# Altium PCB NB3000XN.PcbDoc (part 39 of 71)
Units mil, origin at the board's own origin, x right, y up, seen from the top; angles counter-clockwise.
Board outline 9527.56 x 6929.77 mil, 6 copper layers (Top Layer, GND+SHIELD, MidLayer1, MidLayer2, P2 - 3V3+5V0, Bottom Layer), stack 62.375 mil thick; 832 components, 1027 nets, 4655 pads, 4981 vias.
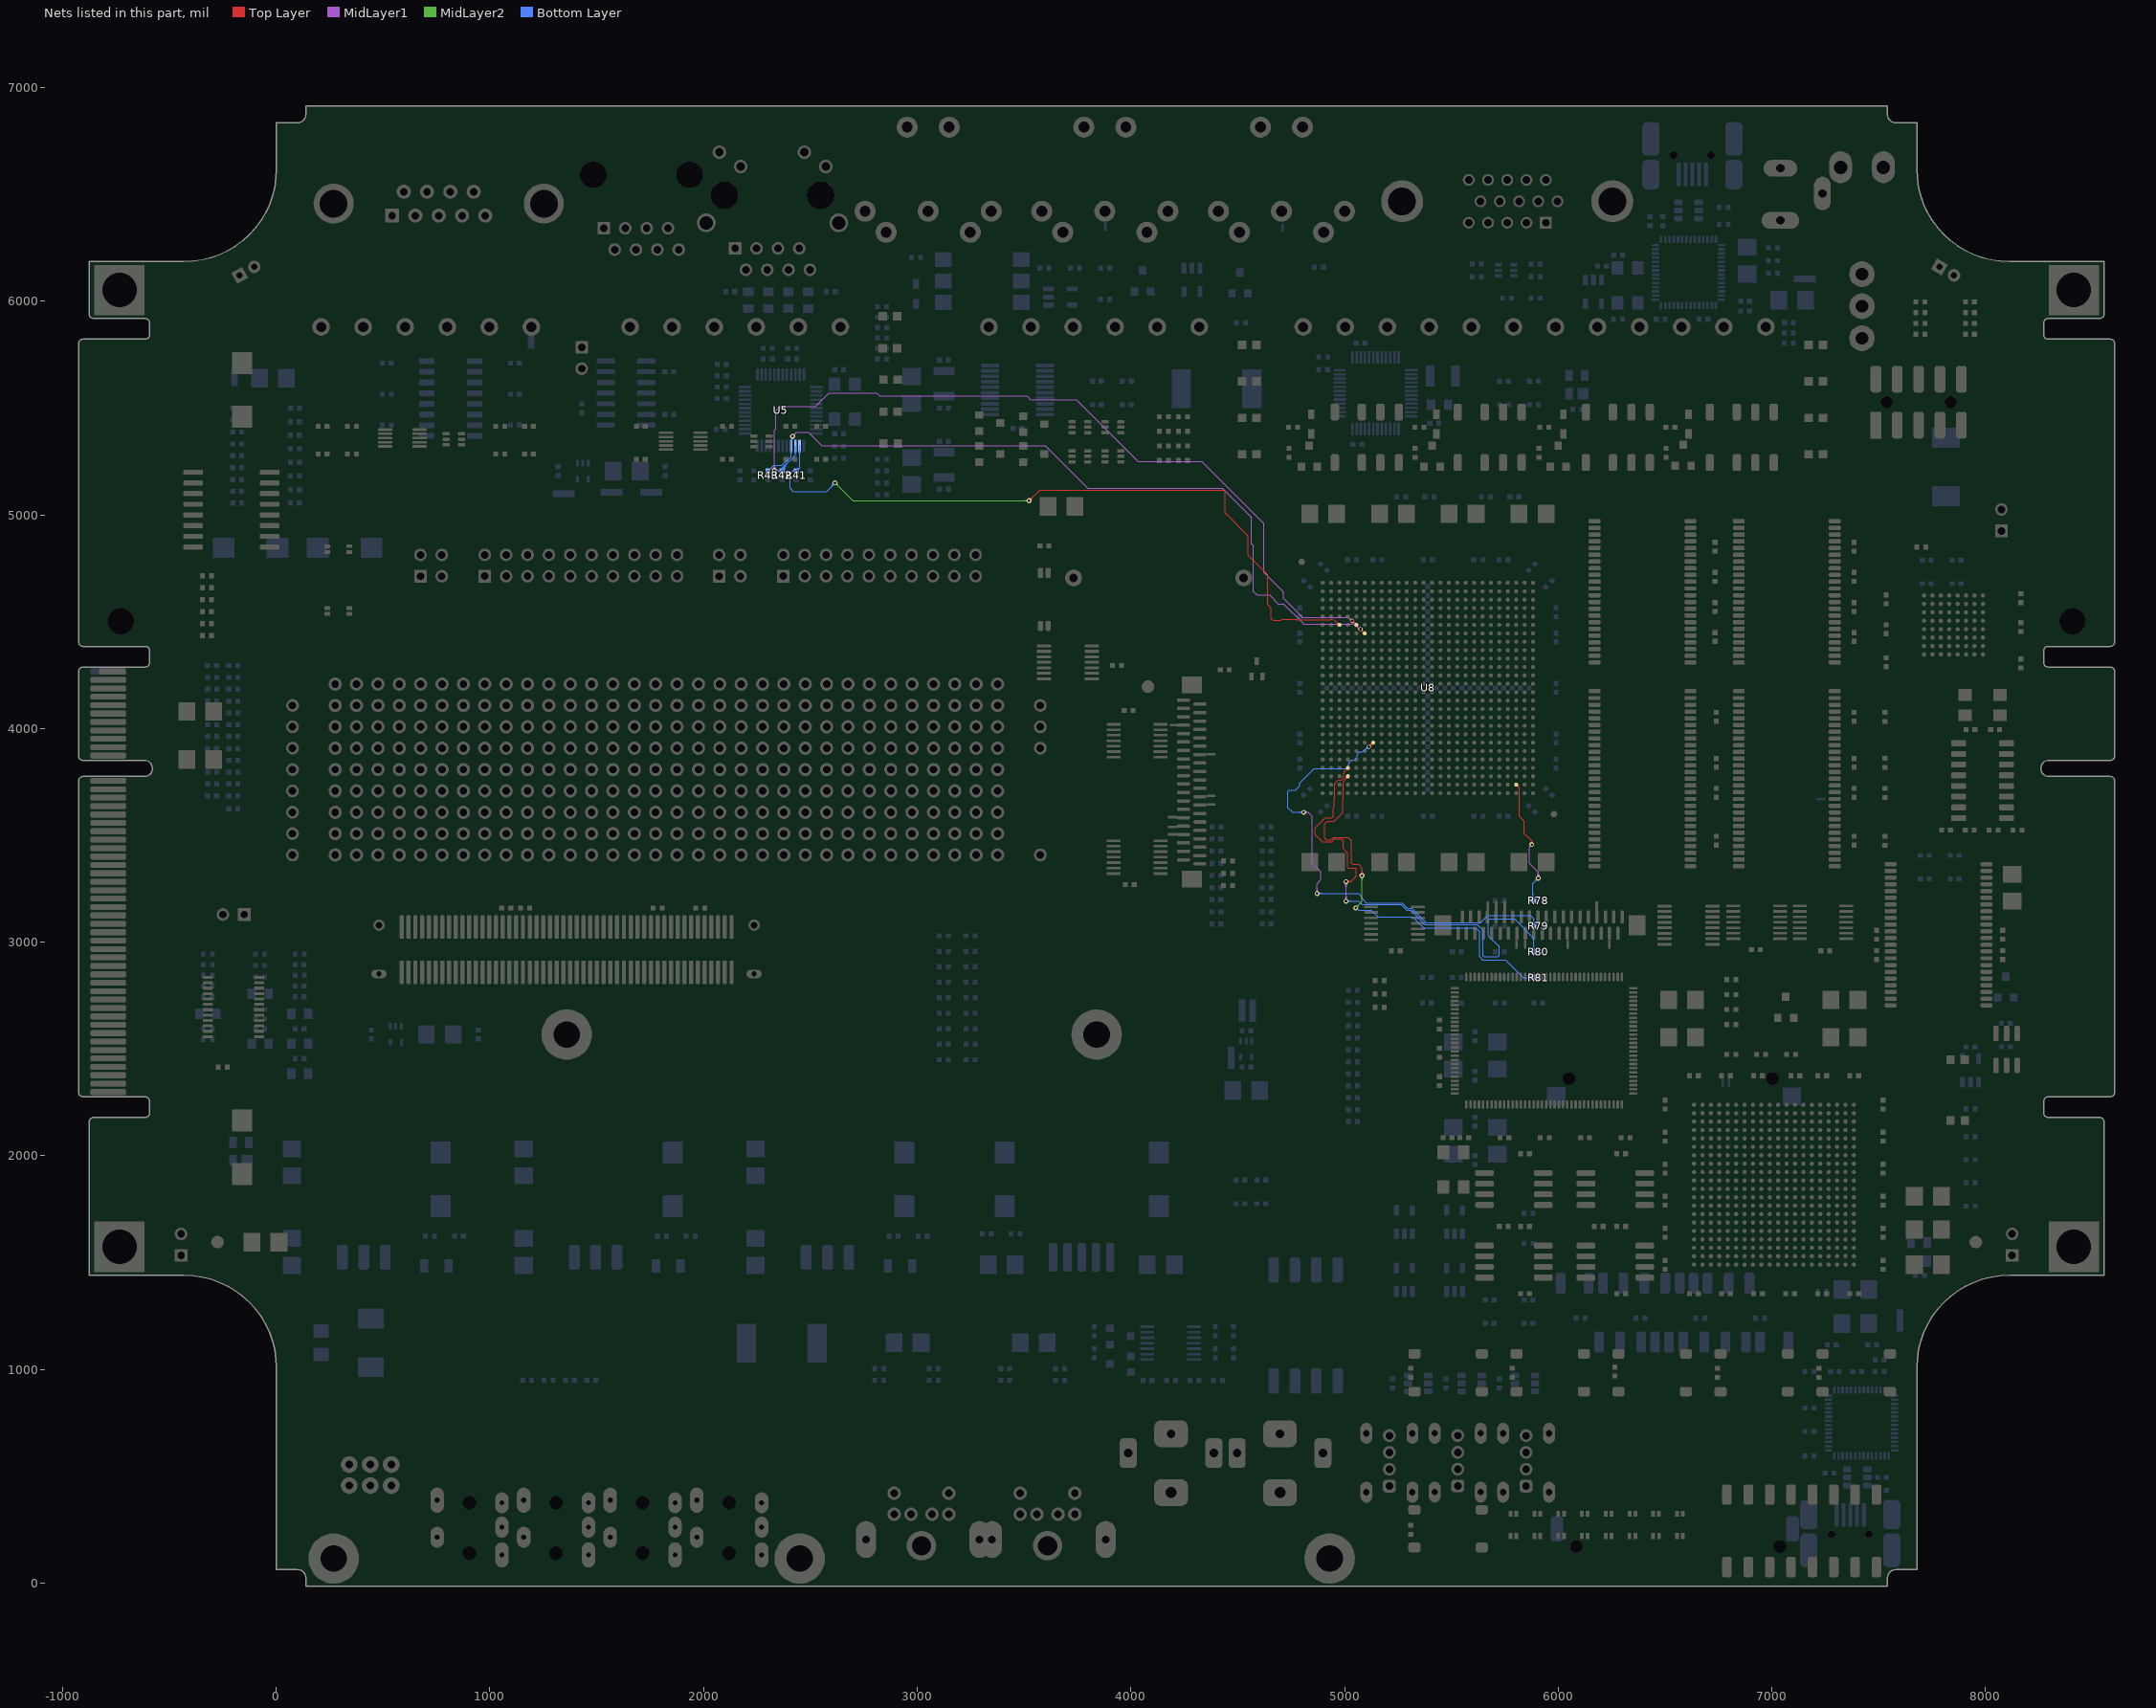
[diagram p43: the nets of this part, all layers, seen from the top]

## Via types
v1: diameter 23, hole 11.81, Top Layer to Bottom Layer, 3672 vias
v2: diameter 26, hole 11.81, Top Layer to Bottom Layer, 461 vias
v3: diameter 19, hole 11.81, Top Layer to Bottom Layer, tented both sides, 396 vias
v4: diameter 23.62, hole 11.81, Top Layer to Bottom Layer, 288 vias
v5: diameter 20, hole 11.81, Top Layer to Bottom Layer, 91 vias
v6: diameter 23, hole 11.81, Top Layer to Bottom Layer, tented both sides, 50 vias
v7: diameter 31, hole 11.81, Top Layer to Bottom Layer, 15 vias
v8: diameter 27.56, hole 11.81, Top Layer to Bottom Layer, tented both sides, 4 vias
v9: diameter 29, hole 11.81, Top Layer to Bottom Layer, 3 vias
v10: diameter 21, hole 11.81, Top Layer to Bottom Layer, 1 vias

## Nets (pads, with @x,y where several pads share a name; then routed paths per layer and width w, separated by ;. In a path a pad name is that pad's centre, name@x,y a point inside that pad or via, vN(x,y) a via of type N, cw(c..) or ccw(c..) an arc to the next point about the centre after c; other vN are vias at no path point) (continued)
ETH.E_TXD2: R43.1 U5.4 U8.G6 | length 3770.4
  Top Layer w4: v3(5075.04,4465.59) U8.G6@5094.72,4445.91 ; U8.G6@5087.22,4445.91 ccw(c5069.12,4445.91) 5081.92,4458.71 ccw(c5094.72,4471.51) U8.G6@5094.72,4453.41 ; U8.G6@5087.38,4445.91 ccw(c5069.66,4445.91) 5082.19,4458.44 ccw(c5094.72,4470.97) U8.G6@5094.72,4453.25 ; 5087.84,4452.79 cw(c5100.65,4465.59) 5082.54,4465.59 ccw(c5100.65,4465.59) 5087.84,4452.79 ; 5087.84,4452.79 ccw(c5075.04,4439.98) 5075.04,4458.09 cw(c5075.04,4439.98) 5087.84,4452.79
  MidLayer1 w4: v1(2416.86,5368.37) 2434.36,5385.87 2491.67,5385.87 2552.5,5325.04 3598.52,5325.04 3798.36,5125.21 4427.42,5125.21 4565,4987.63 4565,4865 4573.52,4856.48 4573.52,4641.71 4590.19,4625.04 4648.52,4625.04 4690.19,4583.37 4715.19,4583.37 4798.56,4500.01 4809.11,4489.45 4860,4489.45 4870,4489.45 4918.62,4489.45 4938.04,4489.45 5012.16,4489.45 ; v1@2416.86,5373.87 ccw(c2416.86,5387.15) 2426.25,5377.76 ccw(c2435.64,5368.37) v1@2422.36,5368.37 ; v1@2416.86,5377.87 ccw(c2416.86,5400.81) 2433.07,5384.59 ccw(c2449.29,5368.37) v1@2426.36,5368.37 ; 4998.23,4489.45 5012.16,4489.45 ; v3@5067.65,4464.29 ccw(c5049.82,4461.14) 5060.21,4475.98 ; v3@5073.74,4472.98 cw(c5070.59,4490.81) 5060.21,4475.98 ; 5012.16,4489.45 5035.41,4489.45 ; 5035.41,4489.45 cw(c5035.41,4465.68) 5035.58,4489.45 ; 5035.41,4489.45 5035.58,4489.45 ; 5035.58,4489.45 cw(c5035.41,4465.68) 5051.63,4483.06 5060.21,4475.98
  Bottom Layer w4: R43.1@2302,5206.18 2329.19,5233.37 2370,5233.37 2370,5233.71 2410.08,5273.79 U5.4@2410.08,5325 ; U5.4@2407.25,5296.32 cw(c2400.41,5289.48) 2410.08,5289.48 ; U5.4@2407.4,5349.17 ccw(c2391.57,5366.71) v1@2415.19,5366.71 ; 2410.08,5289.51 cw(c2419.72,5289.51) U5.4@2412.91,5296.32 ; U5.4@2410.08,5322.68 U5.4@2410.08,5325 ; v1@2410.6,5361.22 cw(c2401.77,5351.12) 2415.19,5351.12 cw(c2424.6,5351.12) v1@2420.75,5359.71 ; v1@2415.19,5357.71 cw(c2399.69,5357.71) U5.4@2410.08,5346.2 ; v1(2416.86,5368.37) v1@2415.19,5366.71 ; U5.4@2410.08,5325 U5.4@2410.08,5346.2 ; U5.4@2410.08,5346.2 2410.19,5346.2 2415.19,5351.2 v1@2415.19,5366.71
ETH.E_TXD3: R42.1 U5.3 U8.F5 | length 4167.2
  Top Layer w4: v3(5035.67,4504.96) U8.F5@5055.35,4485.28 ; U8.F5@5047.85,4485.28 ccw(c5029.75,4485.28) 5042.55,4498.08 ccw(c5055.35,4510.88) U8.F5@5055.35,4492.78 ; U8.F5@5048.01,4485.28 ccw(c5030.29,4485.28) 5042.82,4497.81 ccw(c5055.35,4510.34) U8.F5@5055.35,4492.62 ; 5048.47,4492.16 ccw(c5035.67,4479.35) 5035.67,4497.46 cw(c5035.67,4479.35) 5048.47,4492.16 ; 5048.47,4492.16 cw(c5061.28,4504.96) 5043.17,4504.96 ccw(c5061.28,4504.96) 5048.47,4492.16
  MidLayer1 w4: v1@2325.14,5215.09 ccw(c2308.92,5231.31) 2331.86,5231.31 ccw(c2354.79,5231.31) v1@2338.57,5215.09 ; v1@2327.97,5212.26 ccw(c2318.58,5221.65) 2331.86,5221.65 ccw(c2345.14,5221.65) v1@2335.75,5212.26 ; v1(2331.86,5208.37) 2331.86,5396.67 2337.81,5402.62 2337.81,5487.81 2358.71,5508.71 2523.71,5508.71 2586,5571 2810.5,5571 2825.46,5556.04 3513.96,5556.04 3530,5540 3745,5540 4034.63,5250.37 4331.52,5250.37 4609.25,4972.65 4623.19,4958.71 4623.19,4729.69 4714.86,4638.02 4714.86,4609.36 4803.74,4520.47 4855.26,4520.47 4860,4520.47 4870,4520.47 4918.62,4520.47 5002.99,4520.47 cw(c5003.16,4487.34) 5020.81,4515.38 ; v3@5028.28,4503.66 ccw(c5010.45,4500.51) 5020.84,4515.35 ccw(c5031.22,4530.18) v3@5034.37,4512.35
  Bottom Layer w4: v1(2331.86,5208.37) 2347.86,5208.37 ; v1@2340.2,5203.83 cw(c2347.86,5199.65) 2347.86,5208.37 ; v1@2340.2,5212.92 ccw(c2347.86,5217.1) 2347.86,5208.37 ; R42.1@2359.76,5201 ccw(c2350.05,5194.49) 2350.05,5206.18 ; R42.1@2359.76,5211.37 cw(c2350.05,5217.87) 2350.05,5206.18 ; R42.1@2365.81,5206.18 cw(c2389.06,5206.18) 2372.62,5222.62 ; R42.1@2369.81,5206.18 cw(c2402.72,5206.18) 2379.45,5229.45 ; R42.1@2373.81,5206.18 cw(c2416.37,5206.18) 2386.28,5236.28 ; R42.1@2377.81,5206.18 cw(c2430.03,5206.18) 2393.11,5243.11 ; U5.3@2426.94,5296.32 cw(c2420.11,5289.49) 2429.76,5289.49 cw(c2439.42,5289.49) U5.3@2432.59,5296.32 ; U5.3@2429.76,5322.68 2429.76,5279.76 2368,5218 R42.1@2368,5206.18 2350.05,5206.18 ; 2347.86,5208.37 2350.05,5206.18
ETH.E_TXEN: R41.1 U5.2 U8.F3 | length 3827.7
  Top Layer w4: v1(3523.52,5066.71) 3573.52,5116.71 4431.86,5116.71 4440.19,5108.37 4440.19,5009.81 ; v1@3523.52,5072.21 ccw(c3523.52,5085.49) 3532.91,5076.1 ccw(c3542.3,5066.71) v1@3529.02,5066.71 ; v1@3523.52,5076.21 ccw(c3523.52,5099.14) 3539.74,5082.93 ccw(c3555.96,5066.71) v1@3533.02,5066.71 ; 4448.41,5001.59 4440.19,5009.81 ; 4440.19,5009.81 4548.52,4901.48 4548.52,4810.75 4640.19,4719.08 4640.19,4580.39 4656.86,4563.73 4656.86,4516.04 4665.52,4507.37 4665.62,4507.47 4701.91,4507.47 4706.81,4512.37 4758,4512.37 4775.03,4512.37 4778.27,4509.14 4796.07,4509.14 ; 4796.07,4509.14 4821,4509.14 ; 4796.07,4509.14 4821,4509.14 ; 4821,4509.14 4856.86,4509.14 ; 4856.86,4509.14 4855.26,4509.14 4856.86,4509.14 ; 4856.86,4509.14 4860,4509.14 4870,4509.14 4886.05,4509.14 4936.73,4509.14 ; 4936.73,4509.14 cw(c4936.73,4470.46) 4964.08,4497.81 ; 4936.73,4509.14 cw(c4936.73,4470.46) 4964.08,4497.81 ; 4964.08,4497.81 ccw(c4976.61,4510.34) 4976.61,4492.62 cw(c4976.61,4510.34) 4964.08,4497.81 ; 4964.08,4497.81 cw(c4951.55,4485.28) 4969.27,4485.28 ccw(c4951.55,4485.28) 4964.08,4497.81
  MidLayer2 w4: v1@2615.19,5140.54 cw(c2615.19,5117.61) 2631.41,5133.82 cw(c2647.63,5150.04) v1@2624.69,5150.04 ; v1@2615.19,5144.54 cw(c2615.19,5131.26) 2624.58,5140.65 cw(c2633.97,5150.04) v1@2620.69,5150.04 ; v1(2615.19,5150.04) 2698.52,5066.71 v1(3523.52,5066.71) ; v1@3516.81,5059.99 ccw(c3500.59,5043.77) 3500.59,5066.71 ccw(c3500.59,5089.64) v1@3516.81,5073.43 ; v1@3519.64,5062.82 ccw(c3510.25,5053.43) 3510.25,5066.71 ccw(c3510.25,5079.99) v1@3519.64,5070.6
  Bottom Layer w4: R41.1@2425.73,5201.04 ccw(c2416.18,5194.73) 2416.18,5206.18 ; R41.1@2425.73,5211.32 cw(c2416.18,5217.63) 2416.18,5206.18 ; R41.1@2434.52,5211.5 ccw(c2434.58,5222.94) R41.1@2442.67,5214.85 ; R41.1@2434.54,5215.5 ccw(c2434.65,5236.43) 2449.45,5221.63 ccw(c2463.18,5207.9) R41.1@2443.79,5206.74 ; R41.1@2439.8,5206.5 cw(c2451.31,5207.19) R41.1@2443.16,5215.34 ; U5.2@2446.62,5296.32 cw(c2439.79,5289.49) 2449.45,5289.49 cw(c2459.11,5289.49) U5.2@2452.28,5296.32 ; U5.2@2449.44,5299.15 2449.45,5320.32 U5.2@2449.45,5299.15 ; U5.2@2449.45,5322.68 U5.2@2449.45,5299.15 ; v1@2605.69,5150.04 cw(c2582.76,5150.04) 2598.97,5133.82 cw(c2615.19,5117.61) v1@2615.19,5140.54 ; v1@2609.69,5150.04 cw(c2596.41,5150.04) 2605.8,5140.65 cw(c2615.19,5131.26) v1@2615.19,5144.54 ; v1(2615.19,5150.04) 2575.15,5110 2420,5110 2405,5125 2405,5195 2416.18,5206.18 ; 2416.18,5206.18 R41.1@2434,5206.18 2449.45,5221.63 U5.2@2449.45,5299.15
FPGA_CCLK#: R78.2 U8.AE24 | length 864
  Top Layer w4: v1@5871.35,3465.55 ccw(c5866.32,3474.04) 5876.19,3474.04 ; v1(5876.19,3457.37) 5876.19,3474.04 ; v1@5881.03,3465.55 cw(c5886.06,3474.04) 5876.19,3474.04 ; 5815.92,3724.71 cw(c5808.74,3717.53) 5818.89,3717.53 ; 5815.92,3724.71 cw(c5808.74,3717.53) 5818.89,3717.53 ; 5815.92,3724.71 ccw(c5803.39,3712.17) 5803.39,3729.9 cw(c5803.39,3712.17) 5815.92,3724.71 ; 5815.92,3724.71 cw(c5828.45,3737.24) 5810.73,3737.24 ccw(c5828.45,3737.24) 5815.92,3724.71 ; 5818.89,3717.53 5818.89,3670 5818.89,3660 5818.89,3587.83 5818.86,3587.79 5841.02,3565.62 5841.02,3509.21 5841.86,3508.37 5876.19,3474.04
  MidLayer1 w4: v1(5876.19,3457.37) 5865.19,3446.37 5865.19,3435 5865.19,3369.81 5906.86,3328.14 v1(5906.86,3300.04) ; v1@5900.14,3306.76 ccw(c5883.92,3322.98) 5906.86,3322.98 ccw(c5929.79,3322.98) v1@5913.57,3306.76 ; v1@5902.97,3303.93 ccw(c5893.58,3313.32) 5906.86,3313.32 ccw(c5920.14,3313.32) v1@5910.75,3303.93
  Bottom Layer w4: R78.2@5879.23,3202.08 ccw(c5872.89,3208.43) 5881.86,3208.43 ; 5881.86,3208.24 ccw(c5898.57,3208.24) R78.2@5886.75,3196.42 ; 5881.86,3217.9 ccw(c5908.22,3217.9) R78.2@5889.58,3199.25 ; 5881.86,3227.55 ccw(c5917.88,3227.55) R78.2@5892.41,3202.08 ; R78.2@5885.82,3195 5885.82,3191.71 5881.86,3191.71 5881.86,3195 5881.86,3275.04 v1(5906.86,3300.04) ; v1@5897.36,3300.04 cw(c5874.42,3300.04) 5890.64,3283.82 cw(c5906.86,3267.61) v1@5906.86,3290.54 ; v1@5901.36,3300.04 cw(c5888.08,3300.04) 5897.47,3290.65 cw(c5906.86,3281.26) v1@5906.86,3294.54
FPGA_M0#: R81.2 U8.AD4 | length 2191.8
  Top Layer w4: v1@5075.14,3318.43 ccw(c5058.92,3334.64) 5081.86,3334.64 ccw(c5104.79,3334.64) v1@5088.57,3318.43 ; v1@5077.97,3315.6 ccw(c5068.58,3324.99) 5081.86,3324.99 ccw(c5095.14,3324.99) v1@5085.75,3315.6 ; v1(5081.86,3311.71) 5081.86,3347.37 5065.19,3364.04 5038.19,3364.04 5032.19,3370.04 5032.19,3475.04 5016.86,3490.37 4948.52,3490.37 4936.86,3478.71 4915.19,3478.71 4906.86,3487.04 4906.86,3554.04 4919.52,3566.71 4951.52,3566.71 4992.12,3607.31 4992.12,3660 4992.12,3670 4992.12,3736.73 ; 4992.12,3736.73 cw(c5030.8,3736.73) 5003.45,3764.08 ; 4992.12,3736.73 cw(c5030.8,3736.73) 5003.45,3764.08 ; 5003.45,3764.08 ccw(c4990.92,3776.61) 5008.64,3776.61 cw(c4990.92,3776.61) 5003.45,3764.08 ; 5003.45,3764.08 cw(c5015.98,3751.55) 5015.98,3769.27 ccw(c5015.98,3751.55) 5003.45,3764.08
  MidLayer2 w4: v1@5051.86,3165.87 ccw(c5051.86,3179.15) 5061.25,3169.76 ccw(c5070.64,3160.37) v1@5057.36,3160.37 ; v1@5051.86,3169.87 ccw(c5051.86,3192.81) 5068.07,3176.59 ccw(c5084.29,3160.37) v1@5061.36,3160.37 ; v1@5060.19,3160.37 v1(5051.86,3160.37) 5082.36,3190.87 5082.36,3311.21 v1(5081.86,3311.71) ; v1@5075.14,3304.99 cw(c5057.72,3287.57) 5082.36,3287.57 ; v1@5077.97,3307.82 cw(c5067.37,3297.22) 5082.36,3297.22 ; 5082.36,3289.98 cw(c5103.59,3289.98) v1@5088.57,3304.99 ; 5082.36,3299.64 cw(c5093.93,3299.64) v1@5085.75,3307.82
  Bottom Layer w4: v1(5051.86,3160.37) 5054.86,3160.37 5065.19,3150.04 5125.13,3150.04 5157.8,3117.37 5319.88,3117.37 5370.54,3066.71 5615.19,3066.71 5631.86,3050.04 5631.86,2931.83 5646.69,2917 5680,2917 5709.56,2917 5753.58,2917 5837.21,2833.37 5885.82,2833.37 5885.82,2834.51 R81.2@5885.82,2835 ; 5860.59,2833.37 ccw(c5860.59,2859.74) R81.2@5879.23,2841.1 ; 5866.06,2833.37 cw(c5866.06,2814.75) R81.2@5879.23,2827.92 ; 5870.24,2833.37 ccw(c5870.24,2850.08) R81.2@5882.06,2838.27
FPGA_M1#: R80.2 U8.AC4 | length 2652.2
  Top Layer w4: v1(5006.86,3283.37) 5029.52,3283.37 ; v1@5010.78,3279.52 cw(c5019.98,3270.47) 5019.98,3283.37 cw(c5019.98,3296.28) v1@5010.78,3287.23 ; v1@5013.63,3276.71 cw(c5029.52,3261.09) 5029.52,3283.37 ; v1@5013.63,3290.04 ccw(c5029.52,3305.66) 5029.52,3283.37 ; 5003.45,3803.45 ccw(c4990.92,3815.98) 5008.64,3815.98 cw(c4990.92,3815.98) 5003.45,3803.45 ; 5003.45,3803.45 cw(c5015.98,3790.92) 5015.98,3808.64 ccw(c5015.98,3790.92) 5003.45,3803.45 ; 5003.45,3803.45 5002.06,3802.06 5002.06,3801.97 ccw(c5015.98,3788.06) 4996.3,3788.06 4996.3,3776.61 cw(c4976.61,3776.62) 4976.61,3756.93 ccw(c4976.61,3737.24) 4963.64,3752.05 4955.73,3744.13 4955.73,3743.91 ccw(c4962.9,3736.73) 4952.75,3736.73 4952.75,3670 4952.75,3660 4952.75,3632.69 4946.36,3626.29 4946.36,3588.11 4940.96,3582.71 4909.86,3582.71 4862.32,3535.17 4862.32,3504.25 4895.86,3470.71 4940.17,3470.71 4951.84,3482.37 4985,3482.37 4993.86,3473.52 4993.86,3438.04 5015.19,3416.71 5015.19,3350.04 5017.52,3347.71 5052.19,3347.71 5054.86,3345.04 5054.86,3308.71 5029.52,3283.37
  MidLayer1 w4: v1@5000.14,3198.43 ccw(c4983.92,3214.64) 5006.86,3214.64 ccw(c5029.79,3214.64) v1@5013.57,3198.43 ; v1@5000.14,3276.66 cw(c4983.92,3260.44) 5006.86,3260.44 cw(c5029.79,3260.44) v1@5013.57,3276.66 ; v1@5002.97,3195.6 ccw(c4993.58,3204.99) 5006.86,3204.99 ccw(c5020.14,3204.99) v1@5010.75,3195.6 ; v1@5002.97,3279.49 cw(c4993.58,3270.1) 5006.86,3270.1 cw(c5020.14,3270.1) v1@5010.75,3279.49 ; v1(5006.86,3191.71) v1(5006.86,3283.37)
  Bottom Layer w4: v1(5006.86,3191.71) 5065.19,3191.71 5080.86,3176.04 5265.86,3176.04 5291.86,3150.04 5311.19,3150.04 5377.86,3083.37 5621.15,3083.37 5648.52,3056 5648.52,2977.04 ; v1@5010.75,3187.82 cw(c5020.14,3178.43) 5020.14,3191.71 cw(c5020.14,3204.99) v1@5010.75,3195.6 ; v1@5013.57,3184.99 cw(c5029.79,3168.77) 5029.79,3191.71 cw(c5029.79,3214.64) v1@5013.57,3198.43 ; 5648.19,2996.81 5648.19,2938.12 5652.94,2933.37 5718.52,2933.37 5723.52,2938.37 5723.52,2978.71 5673.52,3028.71 5673.52,3100.04 5681.86,3108.37 5755,3108.37 5790.19,3108.37 5795.54,3108.37 5885.82,3018.1 5885.82,3012.75 R80.2@5885.82,2955.49 ; R80.2@5879.23,2962.08 ccw(c5863.32,2977.99) 5885.82,2977.99 ccw(c5908.32,2977.99) R80.2@5892.41,2962.08 ; R80.2@5882.06,2959.25 ccw(c5872.98,2968.33) 5885.82,2968.33 ccw(c5898.66,2968.33) R80.2@5889.58,2959.25 ; R80.2@5890.19,2955.49 R80.2@5885.82,2955.49 ; R80.2@5885.82,2955.07 R80.2@5885.82,2955 R80.2@5885.82,2955.07 ; R80.2@5885.82,2955.07 R80.2@5885.82,2955.49 ; R80.2@5885.82,2955.07 R80.2@5885.82,2955.49
FPGA_M2#: R79.2 U8.Y7 | length 2622.4
  Top Layer w4: v3(5114.41,3914.41) U8.Y7@5134.09,3934.09 ; U8.Y7@5126.59,3934.09 cw(c5108.49,3934.09) 5121.29,3921.29 cw(c5134.09,3908.49) U8.Y7@5134.09,3926.59 ; U8.Y7@5126.75,3934.09 cw(c5109.03,3934.09) 5121.56,3921.56 cw(c5134.09,3909.03) U8.Y7@5134.09,3926.75 ; 5127.21,3927.21 cw(c5114.41,3940.02) 5114.41,3921.91 ccw(c5114.41,3940.02) 5127.21,3927.21 ; 5127.21,3927.21 ccw(c5140.02,3914.41) 5121.91,3914.41 cw(c5140.02,3914.41) 5127.21,3927.21
  MidLayer1 w4: v1(4808.86,3608.37) 4829.19,3608.37 ; v1@4813.08,3604.85 cw(c4820.63,3598.53) 4820.63,3608.37 cw(c4820.63,3618.22) v1@4813.08,3611.9 ; v1@4816.14,3602.28 cw(c4829.19,3591.37) 4829.19,3608.37 ; v1@4816.14,3614.47 ccw(c4829.19,3625.38) 4829.19,3608.37 ; v1@4865.14,3234.09 ccw(c4848.92,3250.31) 4871.86,3250.31 ccw(c4894.79,3250.31) v1@4878.57,3234.09 ; v1@4867.97,3231.26 ccw(c4858.58,3240.65) 4871.86,3240.65 ccw(c4885.14,3240.65) v1@4875.75,3231.26 ; v1(4871.86,3227.37) 4871.86,3273.71 4890.19,3292.04 4890.19,3328.02 4849.19,3369.02 4849.19,3430 4849.19,3588.37 4829.19,3608.37
  Bottom Layer w4: v1@4801.72,3602.1 ccw(c4787.86,3589.92) 4787.86,3608.37 ; v1@4801.72,3614.65 cw(c4787.86,3626.83) 4787.86,3608.37 ; v1@4804.73,3604.74 ccw(c4796.7,3597.69) 4796.7,3608.37 ccw(c4796.7,3619.06) v1@4804.73,3612.01 ; v1(4808.86,3608.37) 4787.86,3608.37 ; v1(4871.86,3227.37) 5065.19,3227.37 5081.86,3210.71 5081.86,3205 5102.82,3184.04 5269.17,3184.04 5294.84,3158.37 5314.17,3158.37 5380.84,3091.71 5636.67,3091.71 5670,3125.04 5869.96,3125.04 5885.82,3109.18 R79.2@5885.82,3075 ; v1@4875.75,3223.49 cw(c4885.14,3214.1) 4885.14,3227.37 cw(c4885.14,3240.65) v1@4875.75,3231.26 ; v1@4878.57,3220.66 cw(c4894.79,3204.44) 4894.79,3227.37 cw(c4894.79,3250.31) v1@4878.57,3234.09 ; v3@5107.02,3915.71 cw(c5089.19,3918.86) 5099.58,3904.02 ; v3@5113.11,3907.02 ccw(c5109.96,3889.19) 5099.58,3904.02 ; R79.2@5879.23,3082.08 ccw(c5863.32,3097.99) 5885.82,3097.99 ccw(c5908.32,3097.99) R79.2@5892.41,3082.08 ; R79.2@5882.06,3079.25 ccw(c5872.98,3088.33) 5885.82,3088.33 ccw(c5898.66,3088.33) R79.2@5889.58,3079.25 ; 4787.86,3608.37 4756.63,3608.37 4735,3630 4735,3706.54 4740.5,3712.04 4771.19,3712.04 4790.19,3731.04 4790.19,3745.19 4856.9,3811.9 4860,3811.9 4870,3811.9 4879.78,3811.9 4938.04,3811.9 4996.3,3811.9 ccw(c4996.3,3835.67) 5020.07,3835.67 cw(c5035.67,3835.67) 5035.67,3851.27 ccw(c5035.67,3875.04) 5059.44,3875.04 cw(c5075.04,3875.04) 5075.04,3890.64 ccw(c5075.04,3914.41) 5091.85,3897.6 5099.58,3904.02